# Altium PCB nexnclock_one_in12_6x_rev_1_0.PcbDoc (part 2 of 2)
Units mm, origin at the board's own origin, x right, y up, seen from the top; angles counter-clockwise.
Board outline 156 x 35 mm, 2 copper layers (Top Layer, Bottom Layer), stack 1.571 mm thick; 50 components, 43 nets, 219 pads, 67 vias.
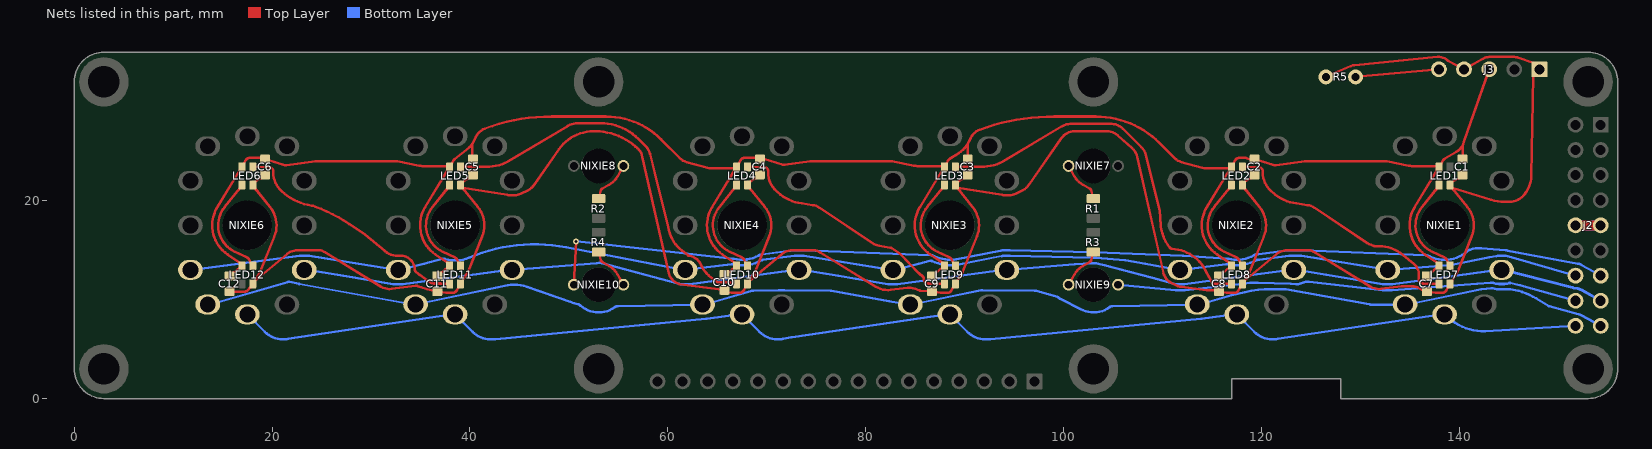
[diagram p2: the nets of this part, all layers, seen from the top]

## Via types
v1: diameter 0.6, hole 0.3, Top Layer to Bottom Layer, tented bottom, 64 vias
v2: diameter 0.6, hole 0.3, Top Layer to Bottom Layer, tented both sides, 2 vias
v3: diameter 0.6, hole 0.3, Top Layer to Bottom Layer, tented top, 1 vias

## Nets (pads, with @x,y where several pads share a name; then routed paths per layer and width w, separated by ;. In a path a pad name is that pad's centre, name@x,y a point inside that pad or via, vN(x,y) a via of type N, cw(c..) or ccw(c..) an arc to the next point about the centre after c; other vN are vias at no path point) (continued)
C10: J2.13 NIXIE10.2 | length 109.3
  Top Layer w0.254: NIXIE10.2@50.5,11.5 v2(50.725,15.875)
  Bottom Layer w0.254: v2(50.725,15.875) 66.552,14.141 cw(c66.464,13.338) 66.656,14.123 66.664,14.121 ccw(c67.5,17.5) 69.167,14.444 69.2,14.462 cw(c69.587,13.753) 69.477,14.553 cw(c69.587,13.753) 69.48,14.554 72.735,14.986 cw(c73,13) 73,15.004 73.5,15.004 73.509,15.004 cw(c73.5,13) 73.577,15.003 73.586,15.002 86.603,14.477 cw(c86.571,13.669) 86.928,14.394 cw(c86.685,13.896) 86.932,14.392 ccw(c88.5,17.5) 89.162,14.083 93.624,14.945 93.629,14.946 93.633,14.947 cw(c94,13) 94,14.981 94.5,14.981 cw(c94.5,13) 94.502,14.981 ; 94.503,14.981 94.511,14.981 cw(c94.5,13) 94.545,14.98 94.555,14.98 103.071,14.784 cw(c103,11.5) 103.129,14.782 103.131,14.782 103.142,14.782 112.053,14.426 112.058,14.426 cw(c112,13) 112.081,14.425 112.086,14.424 112.939,14.376 116.518,14.144 cw(c116.466,13.338) 116.657,14.123 cw(c116.527,13.584) 116.659,14.122 ccw(c117.5,17.5) 119.195,14.459 cw(c119.463,13.975) 119.197,14.461 cw(c119.586,13.753) 119.48,14.554 119.672,14.579 cw(c119.745,14.03) 119.676,14.58 122.748,14.965 122.756,14.966 cw(c123,13) 123,14.981 123.5,14.981 123.584,14.981 123.988,14.981 cw(c123.988,14.173) 124.02,14.98 136.603,14.477 cw(c136.571,13.669) 136.928,14.394 ccw(c138.466,17.433) 137.032,14.344 ccw(c138.466,17.433) 137.034,14.343 ccw(c138.5,17.5) 140.545,14.683 140.999,15.012 cw(c141.148,14.807) 141.074,15.05 cw(c141.957,12.122) 142.184,15.172 142.204,15.17 144.652,14.975 144.658,14.975 cw(c144.5,13) 144.861,14.948 144.868,14.947 151.955,13.626 cw(c151.73,12.42) 152.323,13.494 J2.13@154.27,12.42
C11: J2.14 NIXIE1.10 NIXIE2.10 NIXIE3.10 NIXIE4.10 NIXIE5.10 NIXIE6.10 | length 142.1
  Bottom Layer w0.254: NIXIE6.10@11.75,13 12,13 22.809,14.437 cw(c23,13) 23,14.45 23.5,14.45 cw(c23.5,13) 23.734,14.431 32.5,13 33,13 35.355,13.615 37.234,14.105 cw(c37.347,13.669) 37.471,14.102 37.521,14.088 ccw(c38.5,17.5) 39.881,14.23 ; 39.882,14.23 cw(c46.511,-1.455) 49.727,15.267 49.732,15.266 58.341,13.608 61.5,13 NIXIE4.10@61.75,13 ccw(c61.75,13.45) 61.807,13.004 66.432,13.59 ; 66.433,13.59 cw(c66.464,13.338) 66.524,13.585 66.532,13.583 ccw(c67.5,17.5) 69.432,13.957 69.465,13.976 cw(c69.587,13.753) 69.551,14.004 69.553,14.004 72.809,14.437 cw(c73,13) 73,14.45 73.5,14.45 cw(c73.5,13) 73.734,14.431 82.5,13 83,13 85.355,13.615 86.507,13.915 ; 86.507,13.915 cw(c86.571,13.669) 86.685,13.896 ccw(c88.5,17.5) 89.266,13.538 93.729,14.401 cw(c94,13) 94,14.427 94.5,14.427 cw(c94.5,13) 94.538,14.427 103.056,14.23 cw(c103,11.5) 103.221,14.222 106.215,13.983 cw(c106.194,13.729) 106.238,13.98 106.24,13.979 108.237,13.608 111.5,13 112,13 116.432,13.589 ; 116.433,13.589 cw(c116.466,13.338) 116.527,13.584 ccw(c117.5,17.5) 119.463,13.975 cw(c119.586,13.753) 119.552,14.004 119.745,14.03 122.819,14.415 cw(c123,13) 123,14.427 123.988,14.427 cw(c123.988,14.173) 124.028,14.424 NIXIE1.10@132.75,13 133,13 138.83,13.479 ccw(c138.5,17.5) 139.266,13.538 143.03,14.266 143.729,14.401 cw(c144,13) 144,14.427 144.5,14.427 cw(c144.5,13) 144.892,14.372 J2.14@151.73,12.42
C12: J2.15 NIXIE1.2 NIXIE2.2 NIXIE3.2 NIXIE4.2 NIXIE5.2 NIXIE6.2 | length 132.8
  Bottom Layer w0.254: NIXIE6.2@23.25,13 23.5,13 27.211,12.394 32.266,11.569 ccw(c32.5,13) 32.5,11.55 33,11.55 ccw(c33,13) 33.191,11.563 44,13 NIXIE5.2@44.25,13 44.5,13 52.817,13.692 cw(c53,11.5) 53.57,13.625 59.2,12.115 61.125,11.599 ccw(c61.5,13) 61.5,11.55 62,11.55 ccw(c62,13) 62.191,11.563 66.261,12.104 73,13 NIXIE4.2@73.25,13 73.5,13 77.211,12.394 78.977,12.106 82.266,11.569 ccw(c82.5,13) 82.5,11.55 83,11.55 ccw(c83,13) 83.191,11.563 87.261,12.104 94,13 NIXIE3.2@94.25,13 94.5,13 101.113,13.551 ; 101.114,13.551 cw(c101.134,13.297) 101.117,13.551 102.848,13.672 cw(c103,11.5) 103.486,13.622 104.132,13.474 cw(c104.075,13.227) 104.14,13.472 ; 104.141,13.472 108.949,12.183 111.125,11.599 ccw(c111.5,13) 111.5,11.55 112,11.55 ccw(c112,13) 112.191,11.563 118.032,12.339 123,13 NIXIE2.2@123.25,13 123.5,13 126.537,12.504 132.266,11.569 ccw(c132.5,13) 132.5,11.55 133,11.55 ccw(c133,13) 133.191,11.563 138.488,12.267 NIXIE1.2@144,13
  Bottom Layer w0.3: NIXIE1.2@144.25,13 144.5,13 148.635,11.93 151.417,11.21 ccw(c151.73,12.42) 151.509,11.19 151.951,11.11 cw(c151.73,9.88) 152.345,10.968 J2.15@154.27,9.88
C13: J2.16 NIXIE9.2 | length 46.7
  Bottom Layer w0.254: NIXIE9.2@105.5,11.5 111.31,10.959 ccw(c111.5,13) 111.5,10.95 112,10.95 ccw(c112,13) 112.226,10.962 118.147,11.618 cw(c120.095,-5.972) 119.594,11.718 cw(c119.604,11.337) 119.621,11.718 122.938,11.574 123.494,11.55 ccw(c123.511,11.931) 123.513,11.55 ccw(c123.5,13) 123.515,11.55 ccw(c123.5,13) 124.162,11.71 cw(c124.434,11.175) 124.163,11.71 cw(c124.638,10.774) 124.757,11.818 132.268,10.963 ccw(c132.5,13) 132.5,10.95 133,10.95 ccw(c133,13) 133.152,10.956 ccw(c133,13) 133.156,10.956 ; 133.156,10.956 141.778,11.614 143.151,11.712 143.153,11.712 143.166,11.713 cw(c143.216,10.907) 143.499,11.664 ccw(c144,13) 144,11.573 144.5,11.573 ccw(c144.5,13) 145.001,11.664 ; 145.002,11.664 cw(c145.091,11.426) 145.152,11.673 146.122,11.431 cw(c146.061,11.184) 146.126,11.43 146.128,11.429 J2.16@151.73,9.88
C14: J2.17 NIXIE1.11 NIXIE2.11 NIXIE3.11 NIXIE4.11 NIXIE5.11 NIXIE6.11 | length 144.6
  Bottom Layer w0.254: NIXIE6.11@13.5,9.5 13.75,9.5 21.54,11.769 cw(c21.666,11.337) 21.757,11.778 21.758,11.778 22.704,11.58 ccw(c23,13) 22.743,11.573 34.25,9.5 NIXIE5.11@34.5,9.5 43.808,11.428 cw(c44.543,7.876) 45.742,11.299 50.113,9.769 cw(c49.965,9.344) 50.115,9.769 ; 50.116,9.768 ccw(c52.879,17.665) 50.921,9.531 50.922,9.531 cw(c50.814,9.094) 51.109,9.434 51.163,9.387 ccw(c53,11.5) 54.627,9.221 54.672,9.253 cw(c54.934,8.887) 54.922,9.337 54.924,9.337 63.25,9.5 NIXIE4.11@63.5,9.5 63.75,9.5 68.495,10.882 cw(c68.62,10.45) 68.612,10.9 71.222,10.95 cw(c71.25,9.5) 71.25,10.95 71.75,10.95 cw(c71.75,9.5) 71.767,10.95 76.444,10.9 cw(c76.439,10.45) 76.516,10.893 76.518,10.893 82.349,9.842 84.25,9.5 NIXIE3.11@84.5,9.5 84.641,9.5 91.654,10.952 cw(c91.746,10.512) 91.751,10.962 97.092,10.9 cw(c97.086,10.45) 97.208,10.883 97.21,10.882 99.349,10.265 99.351,10.264 cw(c99.223,9.833) 99.492,10.193 99.514,10.177 ccw(c100.5,11.5) 99.741,10.035 101.712,9.014 ccw(c103,11.5) 104.627,9.221 104.672,9.253 cw(c104.934,8.887) 104.922,9.337 104.924,9.337 113.25,9.5 NIXIE2.11@113.5,9.5 113.75,9.5 116.942,10.43 cw(c121.417,-4.996) 122.411,11.035 cw(c122.384,10.655) 122.451,11.03 130.912,9.506 ccw(c130.978,9.881) 130.976,9.5 NIXIE1.11@134.5,9.5 134.75,9.5 142.194,11.042 ; 142.195,11.042 cw(c142.246,10.793) 142.22,11.046 143.225,11.147 cw(c143.251,10.894) 143.335,11.134 ccw(c144,13) 144,11.019 144.5,11.019 ccw(c144.5,14.299) 145.023,11.061 cw(c145.063,10.81) 145.114,11.059 145.955,10.884 cw(c145.904,10.635) 145.973,10.879 cw(c143.943,3.76) 147.744,10.113 147.747,10.111 149.041,9.338 ccw(c149.171,9.556) 149.104,9.311 149.105,9.311 152.047,8.525 cw(c151.73,7.34) 152.323,8.414 J2.17@154.27,7.34
C15: J2.18 NIXIE1.12 NIXIE2.12 NIXIE3.12 NIXIE4.12 NIXIE5.12 NIXIE6.12 | length 139.7
  Bottom Layer w0.254: NIXIE6.12@17.5,8.5 19.256,6.744 ccw(c21.052,8.54) 21.052,6 21.379,6 ccw(c21.379,7.65) 21.623,6.018 38.25,8.5 NIXIE5.12@38.5,8.5 40.256,6.744 ccw(c42.052,8.54) 42.052,6 42.418,6 ccw(c42.418,7.65) 42.576,6.008 63.889,8.057 ccw(c63.75,9.5) 63.94,8.062 67.25,8.5 NIXIE4.12@67.5,8.5 69.256,6.744 ccw(c71.052,8.54) 71.052,6 71.379,6 ccw(c71.379,7.65) 71.622,6.018 71.625,6.018 ccw(c71.567,6.395) 71.645,6.022 72.473,6.196 cw(c72.684,5.191) 72.536,6.207 88.25,8.5 NIXIE3.12@88.5,8.5 90.256,6.744 ccw(c92.052,8.54) 92.052,6 92.418,6 ; 92.576,6.008 113.889,8.057 ; 113.94,8.062 NIXIE2.12@117.25,8.5 ; NIXIE2.12@117.5,8.5 119.256,6.744 ccw(c121.052,8.54) 121.052,6 121.379,6 ccw(c121.379,7.65) 121.623,6.018 138.25,8.5 NIXIE1.12@138.5,8.5 138.909,8.138 ccw(c142.426,12.143) 142.606,6.816 cw(c142.628,6.367) 142.607,6.816 ccw(c142.243,15.526) 142.609,6.816 J2.18@151.73,7.34
GND: C1.2 C2.2 C3.2 C4.2 C5.2 C6.2 C7.2 C8.2 C9.2 C10.2 C11.2 C12.2 J3.1 J3.4 LED1.2 LED2.2 LED3.2 LED4.2 LED5.2 LED6.2 LED7.2 LED8.2 LED9.2 LED10.2 LED11.2 LED12.2 R5.2 | length 280.3
  Top Layer w0.254: C12.2@15.7,10.8 16.073,10.808 16.67,10.808 17.23,10.808 ccw(c17.23,11.205) 17.52,10.934 17.827,11.262 LED12.2@18.05,11.585 ; C6.2@19.3,22.6 18.927,22.277 18.273,21.908 LED6.2@18.05,21.585 18.25,21.285 19.8,19.347 19.806,19.34 cw(c17.5,17.5) 20.241,16.409 20.239,16.404 18.813,12.842 cw(c18.33,13.035) 18.777,12.769 18.25,11.885 21.542,14.619 cw(c22.596,13.35) 22.596,15 24.533,15 cw(c24.533,13.35) 25.398,14.755 31.006,11.304 31.009,11.302 ccw(c31.871,12.709) 32.075,11.072 34.525,11.378 cw(c34.573,11) 34.719,11.352 ccw(c36.378,15.323) 35.07,11.223 ccw(c39.731,25.837) 36.327,10.88 C11.2@36.7,10.8 ; C11.2@36.711,10.848 37.077,10.766 ccw(c37.437,12.376) 37.215,10.741 37.219,10.741 37.601,10.69 ccw(c37.67,11.205) 37.67,10.685 38.23,10.685 ccw(c38.23,11.205) 38.696,10.974 38.85,11.285 LED11.2@39.05,11.585 39.25,11.885 39.777,12.769 ccw(c39.33,13.035) 39.813,12.842 41.239,16.404 41.241,16.409 ccw(c38.5,17.5) 40.806,19.34 40.8,19.347 39.25,21.285 LED5.2@39.05,21.585 ; C5.2@40.3,22.6 39.927,22.277 39.273,21.908 LED5.2@39.05,21.585 ; C10.2@65.887,10.782 66.461,10.712 cw(c66.26,9.074) 66.571,10.694 ccw(c66.67,11.205) 66.67,10.685 67.23,10.685 ccw(c67.23,11.205) 67.696,10.974 67.85,11.285 68.064,11.575 LED10.2@68.093,11.615 ; C10.2@65.887,10.951 65.514,10.999 61.222,11.541 cw(c61.271,11.918) 61.101,11.577 61.099,11.578 60.847,11.705 cw(c61.5,13) 60.086,12.68 57.43,24.427 ccw(c55.821,24.063) 56.919,25.295 56.917,25.296 56.725,25.466 ccw(c52.693,20.932) 52.693,27 52.471,27 ccw(c52.471,22.749) 48.981,25.176 46.492,21.597 cw(c45.137,22.54) 45.871,21.062 45.145,20.701 cw(c44.5,22) 44.503,20.55 43.997,20.55 cw(c44,22) 43.773,20.568 39.255,21.28 LED5.2@39.05,21.585 ; C4.2@69.3,22.6 68.927,22.277 68.273,21.908 LED4.2@68.05,21.585 68.25,21.285 69.8,19.347 69.806,19.34 cw(c67.5,17.5) 70.241,16.409 70.239,16.404 68.813,12.842 cw(c68.33,13.035) 68.777,12.769 68.25,11.885 71.542,14.619 cw(c72.596,13.35) 72.596,15 74.533,15 cw(c74.533,13.35) 75.398,14.755 81.006,11.304 ccw(c82.219,13.274) 82.505,10.979 84.253,11.197 cw(c84.3,10.819) 84.3,11.2 cw(c84.3,9.205) 84.986,11.078 ; 84.986,11.078 85.381,10.934 ccw(c85.512,11.291) 85.477,10.912 86.327,10.834 86.693,10.801 C9.2@86.7,10.8 ; C9.2@86.702,10.899 ccw(c87.437,12.376) 87.217,10.741 87.601,10.69 ccw(c87.67,11.205) 87.67,10.685 88.23,10.685 ccw(c88.23,11.205) 88.696,10.974 88.85,11.285 LED9.2@89.05,11.585 89.25,11.885 89.777,12.769 ccw(c89.33,13.035) 89.813,12.842 91.239,16.404 91.241,16.409 ccw(c88.5,17.5) 90.806,19.34 90.8,19.347 LED3.2@89.254,21.279 ; C3.2@90.3,22.6 89.927,22.277 89.273,21.908 LED3.2@89.05,21.585 LED3.2@89.255,21.28 ; C8.2@115.7,10.8 115.327,10.957 114.482,10.957 cw(c114.482,11.338) 114.436,10.96 111.913,11.278 cw(c112.127,12.972) 111.358,11.448 110.847,11.705 cw(c111.5,13) 110.086,12.68 107.43,24.427 ccw(c105.821,24.063) 106.919,25.295 106.917,25.296 105.469,26.583 ccw(c104.373,25.35) 104.373,27 101.112,27 ccw(c101.112,25.35) 99.759,26.294 99.758,26.292 96.492,21.597 cw(c95.137,22.54) 95.871,21.062 95.145,20.701 cw(c94.5,22) 94.503,20.55 93.997,20.55 cw(c94,22) 93.773,20.568 LED3.2@89.255,21.28 ; C8.2@115.701,10.805 116.462,10.712 cw(c116.26,9.074) 116.571,10.694 ccw(c116.67,11.205) 116.67,10.685 117.23,10.685 ccw(c117.23,11.205) 117.696,10.974 117.839,11.262 LED8.2@118.064,11.575 ; LED8.2@118.05,11.585 LED8.2@118.25,11.885 ; C2.2@119.3,22.6 118.927,22.277 118.273,21.908 LED2.2@118.05,21.585 118.25,21.285 119.8,19.347 119.806,19.34 cw(c117.5,17.5) 120.241,16.409 120.239,16.404 118.813,12.842 cw(c118.33,13.035) 118.777,12.769 LED8.2@118.25,11.885 ; R5.2@126.5,32.5 129.02,33.6 cw(c129.5,32.5) 129.384,33.694 137.799,34.514 cw(c137.92,33.27) 138.777,34.18 138.779,34.178 ccw(c139.086,34.507) 138.873,34.111 J3.4@140.46,33.27 142.385,34.358 cw(c143,33.27) 143,34.52 145.54,34.52 cw(c145.54,33.27) 145.962,34.447 147.43,33.92 J3.1@148.08,33.27 147.43,32.62 147.262,22.507 cw(c144.214,22.581) 146.699,20.814 ; C7.2@136.7,10.9 136.327,10.957 136.325,10.957 cw(c136.385,11.334) 136.208,10.996 135.771,11.223 ccw(c135.595,10.885) 135.702,11.251 ccw(c134.988,8.787) 135.447,11.311 ccw(c134.988,8.787) 135.345,11.327 ccw(c134.733,6.822) 134.167,11.333 132.075,11.072 cw(c131.871,12.709) 131.009,11.302 131.006,11.304 125.398,14.755 ccw(c124.533,13.35) 124.533,15 122.596,15 ccw(c122.596,13.35) 121.542,14.619 LED8.2@118.25,11.885 ; C7.2@136.702,10.899 ccw(c137.437,12.376) 137.217,10.741 137.601,10.69 ccw(c137.67,11.205) 137.67,10.685 138.23,10.685 ccw(c138.23,11.205) 138.696,10.974 138.85,11.285 LED7.2@139.05,11.585 139.25,11.885 139.777,12.769 ccw(c139.33,13.035) 139.813,12.842 141.239,16.404 141.241,16.409 ccw(c138.5,17.5) 140.806,19.34 140.8,19.347 139.25,21.285 143.184,20.096 ccw(c144.729,25.199) 145.263,19.894 ccw(c145.072,21.754) 146.594,20.666 146.698,20.813 ; LED1.2@139.05,21.585 139.273,21.908 139.927,22.277 C1.2@140.3,22.6
HVGND: J2.9 J2.10 | length 5.1
  Top Layer w1: J2.10@151.73,17.5 J2.9@154.27,17.5
  Bottom Layer w1: J2.10@151.73,17.5 J2.9@154.27,17.5
NetJ3_5: J3.5 R5.1 | length 9
  Top Layer w0.254: R5.1@129.5,32.5 J3.5@137.92,33.27 J3.5@137.42,33.27
NetLED1_1: LED1.1 LED7.3 | length 10.6
  Top Layer w0.254: LED1.1@137.95,21.585 137.75,21.285 136.196,19.343 ccw(c138.5,17.5) 137.249,14.828 138.45,14.266 cw(c138.23,13.795) 138.696,14.026 138.85,13.715 LED7.3@139.05,13.415
NetLED2_1: LED2.1 LED8.3 | length 10.6
  Top Layer w0.254: LED2.1@116.95,21.585 116.75,21.285 115.196,19.343 ccw(c117.5,17.5) 116.249,14.828 117.45,14.266 cw(c117.23,13.795) 117.696,14.026 117.85,13.715 LED8.3@118.05,13.415
NetLED2_3: LED2.3 LED7.1 | length 25.1
  Top Layer w0.254: LED2.3@118.05,23.415 118.273,23.42 118.387,23.423 cw(c118.396,23.042) 118.395,23.423 cw(c118.397,19.416) 118.553,23.42 119.702,23.377 cw(c119.688,22.938) 120.127,22.938 120.127,22.818 ccw(c122.594,22.818) 120.947,20.981 121.376,20.599 ccw(c124.183,24.342) 121.39,20.589 ccw(c124.183,24.342) 123.52,19.711 124.631,19.552 cw(c124.397,17.919) 125.31,19.294 125.311,19.292 130.707,15.695 ccw(c131.621,17.069) 131.262,15.459 131.265,15.458 cw(c131.181,15.087) 131.347,15.429 ccw(c131.514,15.772) 131.545,15.392 cw(c131.855,11.772) 132.803,15.279 cw(c131.747,11.423) 134.302,14.498 135.412,13.576 cw(c134.597,12.594) 135.413,13.575 cw(c134.597,12.594) 135.873,12.594 135.873,12.062 ccw(c136.312,12.062) 136.307,11.623 136.308,11.623 137.727,11.604 LED7.1@137.95,11.585
NetLED3_1: LED3.1 LED9.3 | length 10.6
  Top Layer w0.254: LED3.1@87.95,21.585 87.75,21.285 86.196,19.343 ccw(c88.5,17.5) 87.249,14.828 88.45,14.266 cw(c88.23,13.795) 88.696,14.026 88.85,13.715 LED9.3@89.05,13.415
NetLED3_3: LED3.3 LED8.1 | length 39.4
  Top Layer w0.254: LED3.3@89.05,23.415 89.273,23.417 90.177,23.423 cw(c90.18,23.042) 90.18,23.423 90.687,23.423 ccw(c90.687,23.862) 90.692,23.423 91.95,23.436 ccw(c91.921,27.26) 91.953,23.436 ccw(c91.921,27.26) 93.871,23.97 99.874,27.527 cw(c100.687,26.155) 100.687,27.75 ; 100.687,27.75 104.839,27.75 cw(c104.839,26.155) 105.967,27.283 107.857,25.393 cw(c106.69,24.226) 108.291,24.628 109.708,18.984 ; 109.708,18.983 cw(c109.339,18.891) 109.72,18.895 ccw(c119.232,18.986) 109.776,17.945 ccw(c110.155,17.989) 109.779,17.926 109.802,17.787 cw(c109.427,17.723) 109.808,17.735 ccw(c113.98,17.859) 110.695,15.284 110.696,15.282 ccw(c110.995,15.519) 110.83,15.175 ccw(c110.995,15.519) 110.928,15.144 111.561,15.031 ; 111.563,15.031 cw(c110.889,11.263) 114.26,13.076 114.96,11.777 ccw(c115.295,11.958) 115.295,11.577 ccw(c115.295,11.958) 115.302,11.577 ; 115.303,11.577 cw(c115.312,11.138) 115.312,11.577 116.088,11.577 116.727,11.577 LED8.1@116.95,11.585
NetLED4_1: LED4.1 LED10.3 | length 10.6
  Top Layer w0.254: LED4.1@66.95,21.585 66.75,21.285 65.196,19.343 ccw(c67.5,17.5) 66.249,14.828 67.45,14.266 cw(c67.23,13.795) 67.696,14.026 67.85,13.715 LED10.3@68.05,13.415
NetLED4_3: LED4.3 LED9.1 | length 24.7
  Top Layer w0.254: LED4.3@68.05,23.415 68.273,23.42 68.388,23.423 cw(c68.396,23.042) 68.395,23.423 cw(c68.397,19.416) 68.553,23.42 69.76,23.375 cw(c69.746,22.994) 70.127,22.995 70.127,22.818 ccw(c72.594,22.818) 70.127,22.817 ccw(c72.594,22.818) 70.947,20.981 71.376,20.599 ccw(c74.183,24.342) 71.39,20.589 ccw(c74.183,24.342) 73.52,19.711 74.631,19.552 cw(c74.397,17.919) 75.31,19.294 75.311,19.292 80.707,15.695 ccw(c81.621,17.069) 81.348,15.442 81.349,15.442 82.458,15.257 ; 82.458,15.257 cw(c82.395,14.881) 82.607,15.198 83.374,14.685 cw(c83.162,14.368) 83.433,14.636 85.399,12.636 ccw(c85.67,12.903) 85.425,12.611 85.426,12.61 85.735,12.354 cw(c85.492,12.061) 85.873,12.062 ccw(c86.312,12.062) 86.312,11.623 86.327,11.623 cw(c86.327,11.069) 86.34,11.623 87.727,11.591 LED9.1@87.95,11.585
NetLED5_1: LED5.1 LED11.3 | length 10.6
  Top Layer w0.254: LED5.1@37.95,21.585 37.75,21.285 36.196,19.343 ccw(c38.5,17.5) 37.249,14.828 38.45,14.266 cw(c38.23,13.795) 38.696,14.026 38.85,13.715 LED11.3@39.05,13.415
NetLED5_3: LED5.3 LED10.1 | length 38.9
  Top Layer w0.254: LED5.3@39.05,23.415 39.273,23.417 40.177,23.423 cw(c40.18,23.042) 40.18,23.423 40.688,23.423 ccw(c40.688,23.862) 40.692,23.423 41.951,23.436 ccw(c41.921,27.26) 41.954,23.436 ccw(c41.921,27.26) 43.871,23.97 49.904,27.545 cw(c50.925,25.824) 50.925,27.825 53.171,27.825 cw(c53.169,22.378) 57.022,26.228 57.774,25.476 57.775,25.475 cw(c56.645,24.349) 58.192,24.737 58.939,21.765 60.056,17.319 ccw(c63.567,17.76) 61.425,14.942 62.026,14.486 ccw(c62.255,14.79) 62.2,14.413 cw(c62,13) 63.308,13.569 ccw(c66.429,14.955) 64.346,12.25 64.93,11.806 ccw(c65.159,12.109) 65.159,11.728 66.274,11.728 cw(c66.274,11.289) 66.588,11.597 66.727,11.455 LED10.1@66.95,11.585
NetLED6_1: LED6.1 LED12.3 | length 10.6
  Top Layer w0.254: LED6.1@16.95,21.585 16.75,21.285 15.196,19.343 ccw(c17.5,17.5) 16.249,14.828 17.45,14.266 cw(c17.23,13.795) 17.696,14.026 17.85,13.715 LED12.3@18.05,13.415
NetLED6_3: LED6.3 LED11.1 | length 24.7
  Top Layer w0.254: LED6.3@18.05,23.415 18.273,23.42 18.387,23.423 cw(c18.396,23.042) 18.395,23.423 cw(c18.397,19.416) 18.553,23.42 19.702,23.377 cw(c19.687,22.938) 20.127,22.938 20.127,22.818 ccw(c22.594,22.818) 20.947,20.981 ccw(c24.77,24.951) 23.988,19.496 ; 23.989,19.496 cw(c23.736,17.722) 24.374,19.396 cw(c18.152,3.093) 27.817,17.622 27.82,17.62 29.361,16.593 ; 29.361,16.592 cw(c29.149,16.276) 29.393,16.569 31.409,14.894 ccw(c32.709,16.468) 32.709,14.427 33,14.427 cw(c33,13) 34.426,13.05 ccw(c34.807,13.065) 34.562,12.773 34.726,12.637 34.727,12.636 ccw(c37.673,16.202) 35.065,12.382 36.065,11.699 ccw(c36.312,12.062) 36.312,11.623 36.994,11.623 cw(c36.993,11.242) 37.008,11.623 37.727,11.594 LED11.1@37.95,11.585
NetNIXIE7_1: NIXIE7.1 R1.2 | length 4.3
  Top Layer w0.254: NIXIE7.1@100.5,23.5 101.104,22.43 ccw(c103,23.5) 101.909,21.616 102.662,21.18 cw(c102.535,20.96) 102.78,21.026 102.914,20.523 R1.2@103,20.2
NetNIXIE8_1: NIXIE8.1 R2.2 | length 4.3
  Top Layer w0.254: R2.2@53,20.2 53.086,20.523 53.22,21.026 cw(c53.465,20.96) 53.338,21.18 54.091,21.616 ccw(c53,23.5) 54.896,22.43 NIXIE8.1@55.5,23.5
NetNIXIE9_1: NIXIE9.1 R3.2 | length 4.3
  Top Layer w0.254: NIXIE9.1@100.5,11.5 101.104,12.57 cw(c103,11.5) 101.909,13.384 102.662,13.82 ccw(c102.535,14.04) 102.78,13.974 102.914,14.477 R3.2@103,14.8
NetNIXIE10_1: NIXIE10.1 R4.2 | length 4.3
  Top Layer w0.254: R4.2@53,14.8 53.086,14.477 53.22,13.974 ccw(c53.465,14.04) 53.338,13.82 54.091,13.384 cw(c53,11.5) 54.896,12.57 NIXIE10.1@55.5,11.5
VCC_5V0: C1.1 C2.1 C3.1 C4.1 C5.1 C6.1 C7.1 C8.1 C9.1 C10.1 C11.1 C12.1 J3.3 LED1.4 LED2.4 LED3.4 LED4.4 LED5.4 LED6.4 LED7.4 LED8.4 LED9.4 LED10.4 LED11.4 LED12.4 | length 227.2
  Top Layer w0.254: C12.1@15.7,12.4 16.073,12.703 16.727,13.234 LED12.4@16.95,13.415 16.75,13.715 15.497,14.569 cw(c17.5,17.5) 14.465,19.342 16.75,23.115 LED6.4@16.95,23.415 17.15,23.715 17.304,24.026 cw(c17.77,23.795) 17.77,24.315 18.927,24.315 C6.1@19.3,24.2 19.673,24.083 21.279,23.577 ccw(c21.393,23.941) 21.445,23.564 21.446,23.564 24.384,23.983 24.387,23.984 cw(c24.617,22.35) 24.617,24 32.337,24 cw(c32.337,22.35) 32.66,23.968 34.863,23.527 34.865,23.527 ccw(c35.187,25.145) 35.187,23.495 37.75,23.495 LED5.4@37.95,23.415 ; C11.1@36.7,12.4 37.073,12.703 37.727,13.234 LED11.4@37.95,13.415 37.75,13.715 36.497,14.569 cw(c38.5,17.5) 35.465,19.342 37.75,23.115 LED5.4@37.95,23.415 ; 40.245,25.735 40.245,24.523 C5.1@40.3,24.2 ; C10.1@65.7,12.4 66.073,12.703 66.727,13.234 LED10.4@66.95,13.415 66.75,13.715 65.497,14.569 cw(c67.5,17.5) 64.465,19.342 66.75,23.115 66.817,23.215 LED4.4@66.95,23.415 67.15,23.715 67.304,24.026 cw(c67.77,23.795) 67.77,24.315 68.927,24.315 C4.1@69.3,24.2 69.673,24.24 71.623,23.626 ccw(c71.736,23.99) 71.789,23.613 74.384,23.983 74.387,23.984 cw(c74.617,22.35) 74.617,24 82.337,24 cw(c82.337,22.35) 82.66,23.968 84.863,23.527 84.865,23.527 ccw(c85.187,25.145) 85.187,23.495 87.75,23.495 LED3.4@87.95,23.415 ; LED4.4@66.745,23.263 64.416,23.263 cw(c64.416,24.858) 63.998,23.319 63.996,23.319 61.906,23.889 cw(c62.328,25.427) 61.202,24.298 61.2,24.3 59.303,26.197 ccw(c53.744,20.64) 53.745,28.5 48.25,28.5 48.247,28.5 ccw(c48.247,9.215) 41.51,27.285 ccw(c42.091,25.741) 40.817,26.79 ccw(c42.091,25.741) 40.603,26.454 40.34,25.906 cw(c38.853,26.622) 39.874,25.326 38.448,24.204 ccw(c38.77,23.795) 38.304,24.026 38.15,23.715 LED5.4@37.95,23.415 ; C9.1@86.7,12.4 87.073,12.703 87.727,13.234 LED9.4@87.95,13.415 87.75,13.715 86.497,14.569 cw(c88.5,17.5) 85.465,19.342 87.75,23.115 LED3.4@87.95,23.415 ; 90.288,25.708 90.288,24.523 C3.1@90.3,24.2 ; 114.465,19.342 116.75,23.115 116.817,23.215 LED2.4@116.95,23.415 117.15,23.715 117.304,24.026 cw(c117.77,23.795) 117.77,24.315 118.33,24.315 cw(c118.33,23.795) 118.486,24.291 C2.1@119.113,24.094 ; 114.465,19.342 ccw(c117.5,17.5) 115.497,14.569 116.75,13.715 LED8.4@116.95,13.415 116.727,13.234 116.073,12.703 C8.1@115.7,12.4 ; LED2.4@116.745,23.263 114.416,23.263 cw(c114.416,24.858) 113.998,23.319 113.996,23.319 111.906,23.889 cw(c112.328,25.427) 111.202,24.298 111.2,24.3 109.674,25.826 ccw(c103.22,19.375) 103.221,28.5 99.034,28.5 99.031,28.5 ccw(c99.031,6.592) 91.538,27.179 ccw(c92.105,25.629) 90.624,26.357 90.623,26.354 90.44,25.981 cw(c87.802,27.272) 89.378,24.794 88.563,24.278 cw(c87.682,25.672) 88.513,24.247 cw(c87.682,25.673) 88.51,24.245 ccw(c88.77,23.795) 88.304,24.026 88.15,23.715 LED3.4@87.95,23.415 ; C2.1@119.3,24.2 119.673,24.083 121.278,23.578 ccw(c121.393,23.941) 121.446,23.564 124.384,23.983 124.387,23.984 cw(c124.617,22.35) 124.617,24 132.337,24 cw(c132.337,22.35) 132.66,23.968 134.863,23.527 134.865,23.527 ccw(c135.187,25.145) 135.187,23.495 137.75,23.495 LED1.4@137.95,23.415 ; C7.1@136.7,12.4 137.073,12.703 137.727,13.234 LED7.4@137.95,13.415 137.75,13.715 136.497,14.569 cw(c138.5,17.5) 135.465,19.342 137.75,23.115 LED1.4@137.95,23.415 ; C1.1@140.3,24.2 140.313,24.523 140.313,25.593 ; J3.3@143,33.27 140.435,25.908 ccw(c140.795,25.782) 140.429,25.888 cw(c138.843,26.343) 139.667,24.914 138.51,24.245 ccw(c138.77,23.795) 138.304,24.026 138.15,23.715 LED1.4@137.95,23.415
pads on no net: H1.1 H2.1 H3.1 H4.1 H5.1 H6.1 H7.1 H8.1 J1.1 J1.3 J1.5 J1.7 J1.9 J1.11 J1.13 J1.15 J1.16 LED12.1 NIXIE7.HOLE NIXIE8.HOLE NIXIE9.HOLE NIXIE10.HOLE
copper on no net:
  other v1: 3,1 53,1 103,1 153,1 1.6,1.6 4.4,1.6 51.6,1.6 54.4,1.6 101.6,1.6 104.4,1.6 151.6,1.6 154.4,1.6 1,3 5,3 51,3 55,3 101,3 105,3 151,3 155,3 1.6,4.4 4.5,4.4 51.6,4.4 54.5,4.4 101.6,4.4 104.5,4.4 151.6,4.4 154.5,4.4 3,5 53,5 103,5 153,5 3,30 53,30 103,30 153,30 1.6,30.6 4.4,30.6 51.6,30.6 54.4,30.6 101.6,30.6 104.4,30.6 151.6,30.6 154.4,30.6 1,32 5,32 51,32 55,32 101,32 105,32 151,32 155,32 1.6,33.4 4.5,33.4 51.6,33.4 54.5,33.4 101.6,33.4 104.5,33.4 151.6,33.4 154.5,33.4 3,34 53,34 103,34 153,34

## Keep-outs
Keep-Out Layer:
  lines w0.05: 117,0 128,0 ; 117,0 117,2 128,2 128,0 ; 117,0 3,0 cw(c3,3) 0,3 0,32 cw(c3,32) 3,35 153,35 cw(c153,32) 156,32 156,3 cw(c153,3) 153,0 128,0

## Other copper
Top Layer:
  text "nexnpvnk nexnclock one" at 66.407,32.677 h3
Bottom Layer:
  text "20250514" at 99.873,31.683 h0.64
  text ".Pcb_File_Name_No_Path" at 99.873,30.736 h0.64

## Silkscreen, mask and mechanical layers (free items; w line width, h text height)
Top Overlay:
  drawing of 2 lines, arcs and shapes, not listed
Bottom Overlay:
  drawing of 2 lines, arcs and shapes, not listed
Top Solder:
  text "nexnpvnk nexnclock one" at 66.407,32.677 h3

## Text inside footprints (layer, text, board x,y; h text height)
J1: Bottom Overlay ">" at 99.05,1.2 h1
J2: Bottom Overlay ">" at 155.53,29.223 h1 r45
J3: Bottom Overlay ">" at 147.54,31.02 h1 r270
LED1: Top Overlay ">" at 138.05,20.725 h0.3 r90
LED2: Top Overlay ">" at 117.05,20.725 h0.3 r90
LED3: Top Overlay ">" at 88.05,20.725 h0.3 r90
LED4: Top Overlay ">" at 67.05,20.725 h0.3 r90
LED5: Top Overlay ">" at 38.05,20.725 h0.3 r90
LED6: Top Overlay ">" at 17.05,20.725 h0.3 r90
LED7: Top Overlay ">" at 138.05,10.725 h0.3 r90
LED8: Top Overlay ">" at 117.05,10.725 h0.3 r90
LED9: Top Overlay ">" at 88.05,10.725 h0.3 r90
LED10: Top Overlay ">" at 67.05,10.725 h0.3 r90
LED11: Top Overlay ">" at 38.05,10.725 h0.3 r90
LED12: Top Overlay ">" at 17.05,10.725 h0.3 r90